# Altium PCB uECG.PcbDoc (part 2 of 2)
Units mm, origin at the board's own origin, x right, y up, seen from the top; angles counter-clockwise.
Board outline 18.82 x 18.5 mm, 4 copper layers (Top Layer, Layer 1, Layer 2, Bottom Layer), stack 1.564 mm thick; 53 components, 42 nets, 232 pads, 40 vias.
Unrouted connection lines stored in the file: 26.
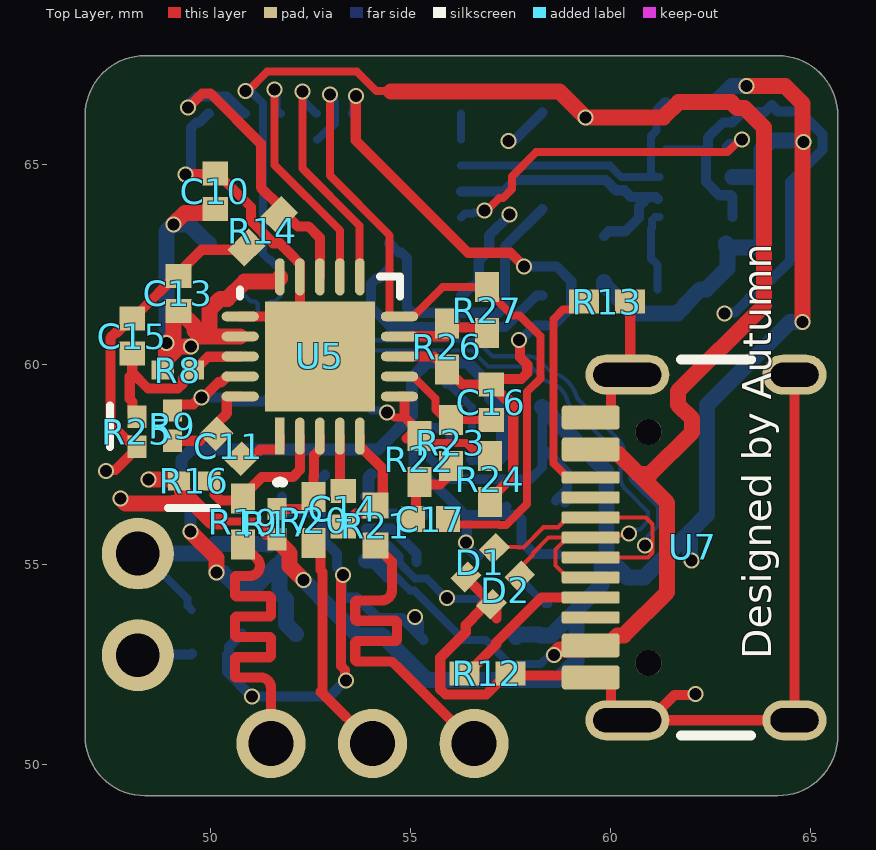
[diagram p0: Top Layer view]

## Via types
v1: diameter 0.4, hole 0.3, Top Layer to Bottom Layer, 40 vias

## Nets (pads, with @x,y where several pads share a name; then routed paths per layer and width w, separated by ;. In a path a pad name is that pad's centre, name@x,y a point inside that pad or via, vN(x,y) a via of type N, cw(c..) or ccw(c..) an arc to the next point about the centre after c; other vN are vias at no path point) (continued)
GND: (continued)
  Top Layer w0.254: v1(47.388,57.333) 47.415,57.361 47.62,57.361 R25.1@48.158,57.899 ; pad.2@47.983,53.141 47.983,52.931 pad.2@48.184,52.73 ; C15.1 48.023,61.147 47.67,60.795 47.629,60.795 47.496,60.661 47.496,58.52 47.921,58.095 48.049,58.095 48.158,57.986 R25.1@48.158,57.899 ; C15.1@48.063,61.147 C13.1@49.321,62.405 ; R25.1 R25.1@48.158,57.899 ; C13.1 49.321,62.334 C13.1@49.321,62.405 ; v1(49.378,64.745) 49.39,64.757 50.188,64.757 51.011,63.934 51.011,63.584 51.569,63.027 51.731,63.027 52.081,62.677 52.081,62.672 52.234,62.519 U5.14 52.234,60.697 51.734,61.197 U5.16 ; R14.1 50.85,62.865 49.781,62.865 C13.1@49.321,62.405 ; U5.21@52.578,59.282 52.734,59.438 U5.21 ; v1(53.315,54.737) 53.315,54.697 53.265,54.648 53.265,52.457 53.363,52.36 53.363,52.123 v1(53.391,52.095) ; D1.2 56.39,54.663 56.995,54.058 D2.2@57.059,54.058 ; 57.15,53.645 57.15,53.966 D2.2@57.059,54.058 ; U7.B12@59.309,52.197 59.283,52.223 57.547,52.223 R12.1 57.421,52.273 56.894,51.746 55.877,51.746 55.744,51.879 55.744,52.667 56.379,53.302 56.379,53.482 56.773,53.875 56.773,53.967 56.808,54.002 D2.2 57.059,54.036 D2.2@57.059,54.058 ; U7.B12 59.84,52.173 60.013,52 60.013,51.447 60.358,51.103 U7.SH@60.421,51.103 ; U7.A12 59.84,58.673 60.013,58.846 60.013,59.398 60.358,59.743 U7.SH@60.421,59.743 ; R13.1 60.494,59.902 U7.SH@60.63,59.766 ; v1(62.128,51.765) 62.1,51.737 61.605,51.737 U7.SH@60.971,51.103 ; U7.SH@64.601,59.743 64.601,51.103 U7.SH@60.971,51.103 ; U7.SH@60.421,51.103 U7.SH@60.971,51.103 ; U7.SH@60.421,51.103 U7.SH@60.971,51.103
  Bottom Layer w0.254: pad.2@47.983,53.044 47.983,52.931 48.184,52.73 48.201,52.748 49.513,52.748 C1.2 ; v1(49.378,64.745) 49.378,64.784 49.512,64.919 49.512,65.912 49.645,66.045 49.716,66.045 49.939,66.268 U4.H8 ; C7.1 50.462,52.941 50.462,52.785 50.419,52.742 50.419,52.309 v1(51.034,51.694) 52.971,51.694 53.373,52.095 v1(53.391,52.095) ; U1.5 U1.4 52.513,56.298 52.836,55.975 U1.11 52.836,55.598 53.159,55.275 53.159,54.932 53.315,54.777 v1(53.315,54.737) ; U1.11@52.762,55.971 52.762,57.138 R4.1 ; v1@53.283,54.743 53.283,54.235 53.343,54.175 53.343,54.166 53.666,54.166 54.177,53.654 54.787,53.654 C4.2@55.206,53.234 ; v1(55.116,53.688) 55.116,53.648 55.206,53.558 C4.2@55.206,53.234 ; C4.2 C4.2@55.206,53.234 ; U2.3 55.445,58.402 55.259,58.402 55.08,58.223 55.08,57.455 55.213,57.322 55.268,57.322 R6.1@56.366,56.224 ; U2.3@55.53,58.402 55.964,58.402 56.007,58.359 U2.7 ; U4.A1 56.279,61.718 56.502,61.941 56.573,61.941 56.706,62.074 56.706,62.589 56.97,62.852 56.97,63.225 57.479,63.734 v1(57.479,63.741) ; v1(56.381,55.55) v1@56.409,55.55 ; R5.1 56.634,55.22 56.409,55.444 v1@56.409,55.55 ; C5.1 C5.1@57.19,56.236 ; v1(57.455,65.583) 57.483,65.611 57.61,65.611 TP6.1 ; C6.1 58.681,55.256 58.098,55.256 57.777,55.577 57.777,56.127 57.668,56.236 C5.1@57.19,56.236 ; U3.1 U3.2 U3.3 ; v1(62.85,61.268) 62.878,61.296 63.113,61.296 63.759,61.942 C2.1 63.952,62.115 64.013,62.115 64.491,62.593 64.491,64.553 65.298,65.36 65.298,65.755 64.734,66.318 64.195,66.318 C3.1 63.86,66.307 63.332,66.307 63.306,66.307 63.045,66.046 62.811,66.046 62.438,65.674 62.438,65.39 U3.3 ; U3.7 U3.6 63.005,64.228 62.721,64.228 62.39,64.559 U3.3 ; v1@56.409,55.55 56.406,55.554 56.406,56.212 R6.1 C5.1@57.19,56.236
HPDRIVE: C11.1 U5.1 | length 1.4
  Top Layer w0.254: C11.1 51.012,57.642 51.238,57.868 51.727,57.868 51.734,57.876 U5.1
HPSENSE: C11.2 R9.2 U5.20 | length 2.5
  Top Layer w0.254: R9.2 49.053,58.089 49.186,58.089 49.737,58.089 49.912,58.264 C11.2 50.145,58.509 50.405,58.769 50.405,59.19 50.412,59.197 U5.20
IAOUT: C9.1 R9.1 U5.19 | length 4.4
  Top Layer w0.254: R9.1@49.047,58.803 R9.1@49.047,58.891 ; R9.1@49.157,59 49.568,59 49.738,59.17 49.817,59.17 50.199,59.551 50.266,59.551 U5.19@50.405,59.69
  Bottom Layer w0.254: v1(49.778,59.17) 50.384,59.17 50.486,59.068 51.358,59.068 52.138,59.848 C9.1
INT1: U3.4 U4.A4 | length 8.6
  Top Layer w0.2: v1(56.845,63.841) 56.899,63.841 57.22,64.162 57.319,64.162 57.537,64.381 57.537,64.7 58.141,65.303 62.923,65.303 63.235,65.616 v1(63.289,65.616)
  Bottom Layer w0.2: U4.A4 56.359,63.768 56.554,63.768 56.589,63.803 56.807,63.803 v1(56.845,63.841) ; U3.4 62.89,65.455 62.965,65.53 63.078,65.53 63.126,65.578 63.251,65.578 v1(63.289,65.616)
NetC14_1: C14.1 R21.1 U5.5 | length 3.2
  Top Layer w0.254: C14.1 53.335,55.948 53.508,56.121 53.508,56.146 53.632,56.27 53.933,56.27 R21.1 54.172,56.468 54.305,56.602 54.305,57.39 53.827,57.868 53.741,57.868 53.734,57.876 U5.5
NetC14_2: C14.2 U5.4 | length 1.4
  Top Layer w0.254: U5.4 53.241,58.2 53.241,56.901 C14.2
NetC17_2: C17.2 R22.1 R23.1 | length 2.3
  Top Layer w0.254: C17.2 55.106,56.087 55.139,56.087 55.139,56.977 R22.1 ; R22.1@55.22,56.997 55.738,56.997 56.171,57.43 R23.1@56.171,57.505
NetDS1_1: DS1.1 R1.2 | length 1
  Bottom Layer w0.2: DS1.1 58.368,54.003 R1.2
NetJ3_1: J3.1 R19.1 | length 9.8
  Top Layer w0.254: R19.1 50.86,55.445 51.161,55.144 cw(c50.981,54.965) 50.981,54.711 50.66,54.711 ccw(c50.66,54.66) 50.609,54.66 50.609,54.253 ccw(c50.66,54.253) 50.66,54.203 51.46,54.203 cw(c51.46,54.152) 51.511,54.152 51.511,53.745 cw(c51.46,53.745) 51.46,53.695 50.66,53.695 ccw(c50.66,53.644) 50.609,53.644 50.609,53.237 ccw(c50.66,53.237) 50.66,53.187 51.46,53.187 cw(c51.46,53.136) 51.511,53.136 51.511,52.729 cw(c51.46,52.729) 51.46,52.679 50.66,52.679 ccw(c50.66,52.628) 50.609,52.628 50.609,52.221 ccw(c50.66,52.221) 50.66,52.171 51.257,52.171 cw(c51.257,51.917) 51.511,51.917 51.511,51.79 J3.1
NetJ3_2: J3.2 R20.1 | length 5.7
  Top Layer w0.254: R20.1 52.751,55.358 52.751,54.858 52.801,54.808 52.801,51.861 52.756,51.816 J3.2
NetJ3_3: J3.3 R21.2 | length 9.6
  Top Layer w0.254: R21.2 54.144,55.455 54.534,55.065 54.534,54.352 cw(c54.28,54.352) 54.28,54.098 53.67,54.098 ccw(c53.67,54.047) 53.619,54.047 53.619,53.641 ccw(c53.67,53.641) 53.67,53.59 54.61,53.59 cw(c54.61,53.539) 54.661,53.539 54.661,53.133 cw(c54.61,53.133) 54.61,53.082 53.67,53.082 ccw(c53.67,53.031) 53.619,53.031 53.619,52.625 ccw(c53.67,52.625) 53.67,52.574 54.454,52.574 cw(c54.453,52.32) 54.563,52.548 54.69,52.421 J3.3
NetR2_1: R2.1 U2.4 | length 1.4
  Bottom Layer w0.2: R2.1 55.967,59.495 56.532,58.93 U2.4
NetR3_2: R3.2 U3.12 | length 2
  Bottom Layer w0.2: R3.2 61.172,62.49 61.015,62.647 61.015,63.388 61.04,63.413 61.04,63.605 61.115,63.68 U3.12
NetR4_2: R4.2 U1.6 | length 0.6
  Bottom Layer w0.3: U1.6 53.901,56.698 53.951,56.748 53.951,57.176 R4.2
NetR5_2: R5.2 U1.8 | length 1.7
  Bottom Layer w0.254: U1.8 54.517,55.898 55.153,55.262 55.153,55.067
NetR6_2: R6.2 U1.7 | length 1.5
  Bottom Layer w0.254: U1.7 53.913,56.271 55.311,56.271 R6.2@55.347,56.236
NetR16_2: R16.2 R19.2 U5.2 | length 3.8
  Top Layer w0.254: R16.2 49.99,57.087 50.1,56.977 50.1,56.748 50.249,56.599 50.773,56.599 R19.2 50.815,56.716 51.28,57.181 52.054,57.181 52.234,57.36 U5.2
NetR17_2: R17.2 R20.2 U5.3 | length 2.7
  Top Layer w0.254: R17.2 52.355,56.383 52.578,56.606 R20.2 52.578,57.204 52.588,57.214 52.588,57.73 52.734,57.876 U5.3
NetU4_A7: U4.A7 U4.A8 | length 0.6
  Bottom Layer w0.2: U4.A7 U4.A8
OPAM+: C16.2 R23.2 U5.7 | length 2.7
  Top Layer w0.2: U5.7 55.07,59.697 55.621,59.147 55.621,58.874 R23.2@55.821,58.674 ; R23.2 57.022,58.614 C16.2
OPAM-: R26.1 R27.2 U5.9 | length 3.4
  Top Layer w0.254: R26.1@55.917,60.739 55.883,60.705 55.063,60.705 U5.9@55.056,60.697 ; R26.1@55.917,60.866 56.044,60.993 56.115,61.064 56.115,60.922 56.854,60.922 R27.2@56.907,60.975 ; U5.9 U5.9@55.056,60.697 ; U5.9 U5.9@55.056,60.697 ; U5.9 U5.9@55.056,60.697 ; U5.9 U5.9@55.056,60.697
REFIN: C15.2 R8.2 R25.2 U5.18 | length 4.8
  Top Layer w0.254: 47.98,59.701 47.98,59.132 48.049,59.063 48.049,58.804 R25.2 ; C15.2 48.043,59.788 48.436,59.395 49.184,59.395 49.317,59.528 49.317,59.656 49.519,59.858 R8.2 ; R8.2@49.606,59.858 49.938,60.19 50.736,60.19 U5.18
REFOUT: C16.1 R24.1 R26.2 U4.D8 U5.8 | length 19.1
  Top Layer w0.254: v1(53.632,66.707) 53.632,65.596 56.439,62.789 57.499,62.789 v1(57.839,62.449) ; U5.8 55.592,60.197 55.917,59.872 56.294,59.495 57.043,59.495 57.216,59.322 57.216,59.302 57.376,59.142 57.437,59.142 ; R24.1@56.99,56.503 56.99,56.63 57.431,57.07 57.57,57.07 57.57,59.009 57.437,59.142 ; C16.1 57.164,59.636 57.771,59.636 57.919,59.785 57.919,59.995 57.737,60.178 57.737,60.576 v1(57.709,60.604) ; C16.1@57.216,59.291 57.365,59.142 57.437,59.142
  Bottom Layer w0.254: U4.D8 53.604,66.312 53.604,66.679 v1(53.632,66.707) ; v1(57.709,60.604) 57.748,60.604 58.117,60.973 58.573,60.973 59.02,61.421 59.02,62.08 58.651,62.449 v1(57.839,62.449)
SCL: R11.1 U3.13 U4.A5 | length 6.8
  Bottom Layer w0.254: U4.A5 57.328,64.318 57.618,64.608 59.879,64.608 60.134,64.353 60.347,64.353 60.52,64.18 60.846,64.18 61.132,64.18 U3.13@61.18,64.132 ; R11.1@59.843,63.213 59.956,63.327 60.375,63.327 60.713,63.665 60.713,63.949 60.846,64.082
SDA: R10.1 U3.14 U4.A6 | length 7.2
  Bottom Layer w0.2: U4.A6 59.982,64.968 60.27,64.68 U3.14 ; U3.14@61.078,64.717 61.015,64.78 61.015,65.713 61.151,65.849 61.151,66.373 61.351,66.573 R10.1
STATA1: DS1.2 U1.9 | length 3.9
  Bottom Layer w0.2: U1.9 54.436,55.498 54.726,55.208 54.726,55.031 55.117,54.641 55.41,54.641 55.889,54.162 v1(55.915,54.162) 55.943,54.134 56.761,54.134 56.832,54.063 57.035,54.063 DS1.2
SW: C9.2 R22.2 R24.2 U5.6 | length 5.9
  Top Layer w0.2: v1(54.408,58.803) 54.462,58.803 54.599,58.666 54.836,58.666 ; R22.2@55.058,58.37 55.388,58.039 56.39,58.039 56.556,57.873 56.822,57.873 R24.2
  Top Layer w0.254: U5.6 54.844,59.197 54.852,59.19 54.852,58.682 55.106,58.427 55.106,58.352 54.901,58.147
  Bottom Layer w0.2: C9.2 53.018,59.848 54.025,58.841 54.37,58.841 v1(54.408,58.803)
SWCLK: TP4.1 U4.C3 | length 7.2
  Bottom Layer w0.254: U4.C3 54.479,63.018 54.702,62.795 54.773,62.795 54.909,62.659 54.909,61.427 55.045,61.291 57.213,61.291 57.362,61.44 57.362,62.95 TP4.1
SWDIO: TP3.1 U4.C2 | length 6
  Bottom Layer w0.254: U4.C2 54.439,62.368 54.216,62.145 54.145,62.145 54.012,62.012 54.012,61.424 54.499,60.937 57.367,60.937 58.152,61.722 TP3.1
VBUS: C4.1 U1.10 U4.F2 U7.A4 U7.A9 U7.B4 U7.B9 | length 43.5
  Top Layer w0.2: v1(50.88,66.831) 50.933,66.831 51.15,67.048 51.15,67.052 51.414,67.316 53.659,67.316 54.144,66.831 54.508,66.831 ; 58.728,66.818 58.744,66.802
  Top Layer w0.4: 54.508,66.818 58.728,66.818 ; v1(58.587,52.731) 58.729,52.873 59.406,52.873 U7.A4 59.931,52.973 60.181,53.223 60.333,53.223 61.417,54.306 61.417,56.539 60.693,57.262 ; 58.744,66.802 v1(59.372,66.173) 61.319,66.173 61.701,66.555 63.02,66.555 63.171,66.404 63.356,66.404 63.839,65.921 63.839,61.48 61.683,59.324 61.683,58.992 62.039,58.636 62.039,58.305 60.996,57.262 60.693,57.262 ; U7.A9 59.606,57.773 60.183,57.773 60.693,57.262
  Bottom Layer w0.2: v1(50.88,66.831) 50.918,66.793 51.037,66.793 51.309,66.521 51.309,62.765 51.456,62.618 51.489,62.618 51.739,62.368 U4.F2 ; 54.468,54.724 54.538,54.795 54.992,54.341 55.1,54.341 C4.1 56.879,53.111 57.478,52.513 58.253,52.513 58.433,52.692 58.548,52.692 v1(58.587,52.731)
  Bottom Layer w0.4: U1.10 54.093,55.098 54.468,54.724
VOUT: C5.2 C7.2 R2.2 U1.1 U2.6 | length 19.6
  Top Layer w0.4: v1(49.494,55.82) 50.15,55.165 v1(50.15,54.794)
  Bottom Layer w0.3: v1(49.494,55.82) 49.494,56.643 49.272,56.865 49.272,57.618 49.531,57.876 54.189,57.876 55.034,58.721 55.034,59.665 55.413,60.045 56.417,60.045 56.967,59.495 R2.2 56.986,59.439 56.986,59.149 57.285,58.85 57.285,57.919 C5.2 57.243,57.639 U2.6
  Bottom Layer w0.4: v1(50.15,54.794) 50.311,54.794 50.643,54.462 51.15,54.462 51.686,54.998 51.736,54.998 U1.1@51.786,55.048 ; U1.1 U1.1@51.786,55.048 ; C7.2 51.885,53.514 51.885,54.123 51.723,54.286 51.723,54.986 U1.1@51.786,55.048
pads on no net: U1.3 U2.5 U3.9 U3.10 U3.11 U4.A2 U4.A3 U4.B1 U4.B2 U4.B3 U4.B4 U4.B5 U4.B6 U4.B7 U4.B8 U4.C1 U4.C4 U4.C5 U4.C6 U4.C7 U4.C8 U4.D1 U4.D2 U4.D3 U4.D4 U4.D5 U4.D6 U4.D7 U4.E1 U4.E2 U4.E3 U4.E4 U4.E5 U4.E6 U4.F3 U4.F4 U4.F5 U4.F6 U4.F7 U4.G2 U4.G3 U4.G4 U4.G5 U4.G6 U4.G7 U4.H1 U4.H5 U4.H6 U4.H7 U7.A8 U7.B8 U7.Un1 U7.Un2

## Polygon pours and split planes (outlines as drawn)
3V3 on Bottom Layer "3V3" (solid, remove dead copper, pour order 0): 46.706,67.283 65.216,67.283 65.216,49.376 64.632,49.96 46.68,49.96
GND on Layer 2 (split plane): 64.313,67.199 64.441,67.174 64.563,67.132 64.68,67.075 64.788,67.003 64.885,66.917 64.971,66.82 65.043,66.712 65.1,66.595 65.142,66.473 65.167,66.345 65.175,66.228 65.174,66.216 65.174,50.717 65.175,50.705 65.167,50.588 65.142,50.46 65.1,50.338 65.043,50.221 64.971,50.113 64.885,50.016 64.788,49.93 64.68,49.858 64.563,49.801 64.441,49.759 64.313,49.734 64.196,49.726 64.184,49.727 48.363,49.727 48.351,49.726 48.234,49.734 48.106,49.759 47.984,49.801 47.867,49.858 47.759,49.93 47.662,50.016 47.576,50.113 47.504,50.221 47.447,50.338 47.405,50.46 47.38,50.588 47.372,50.705 47.373,50.717 47.373,66.216 47.372,66.228 47.38,66.345 47.405,66.473 47.447,66.595 47.504,66.712 47.576,66.82 47.662,66.917 47.759,67.003 47.867,67.075 47.984,67.132 48.106,67.174 48.234,67.199 48.351,67.207 48.363,67.206 64.184,67.206 64.196,67.207
GND on Layer 1 (split plane): 64.313,67.199 64.441,67.174 64.563,67.132 64.68,67.075 64.788,67.003 64.885,66.917 64.971,66.82 65.043,66.712 65.1,66.595 65.142,66.473 65.167,66.345 65.175,66.228 65.174,66.216 65.174,50.717 65.175,50.705 65.167,50.588 65.142,50.46 65.1,50.338 65.043,50.221 64.971,50.113 64.885,50.016 64.788,49.93 64.68,49.858 64.563,49.801 64.441,49.759 64.313,49.734 64.196,49.726 64.184,49.727 48.363,49.727 48.351,49.726 48.234,49.734 48.106,49.759 47.984,49.801 47.867,49.858 47.759,49.93 47.662,50.016 47.576,50.113 47.504,50.221 47.447,50.338 47.405,50.46 47.38,50.588 47.372,50.705 47.373,50.717 47.373,66.216 47.372,66.228 47.38,66.345 47.405,66.473 47.447,66.595 47.504,66.712 47.576,66.82 47.662,66.917 47.759,67.003 47.867,67.075 47.984,67.132 48.106,67.174 48.234,67.199 48.351,67.207 48.363,67.206 64.184,67.206 64.196,67.207

## Other copper
Layer 1 (plane layer: these items are gaps in the copper):
  lines w0.2: 59.817,65.786 59.817,66.603 61.276,66.603
Layer 2 (plane layer: these items are gaps in the copper):
  lines w0.2: 59.817,65.786 59.817,66.603 61.276,66.603

## Silkscreen, mask and mechanical layers (free items; w line width, h text height)
Top Overlay:
  text "Designed by Autumn" at 64.262,52.629 h1.24 r90
Mechanical 1:
  the board outline again, w0.013